# EAGLE board RedBoard_panel_v22 (EAGLE 7.5.0), part 1 of 6
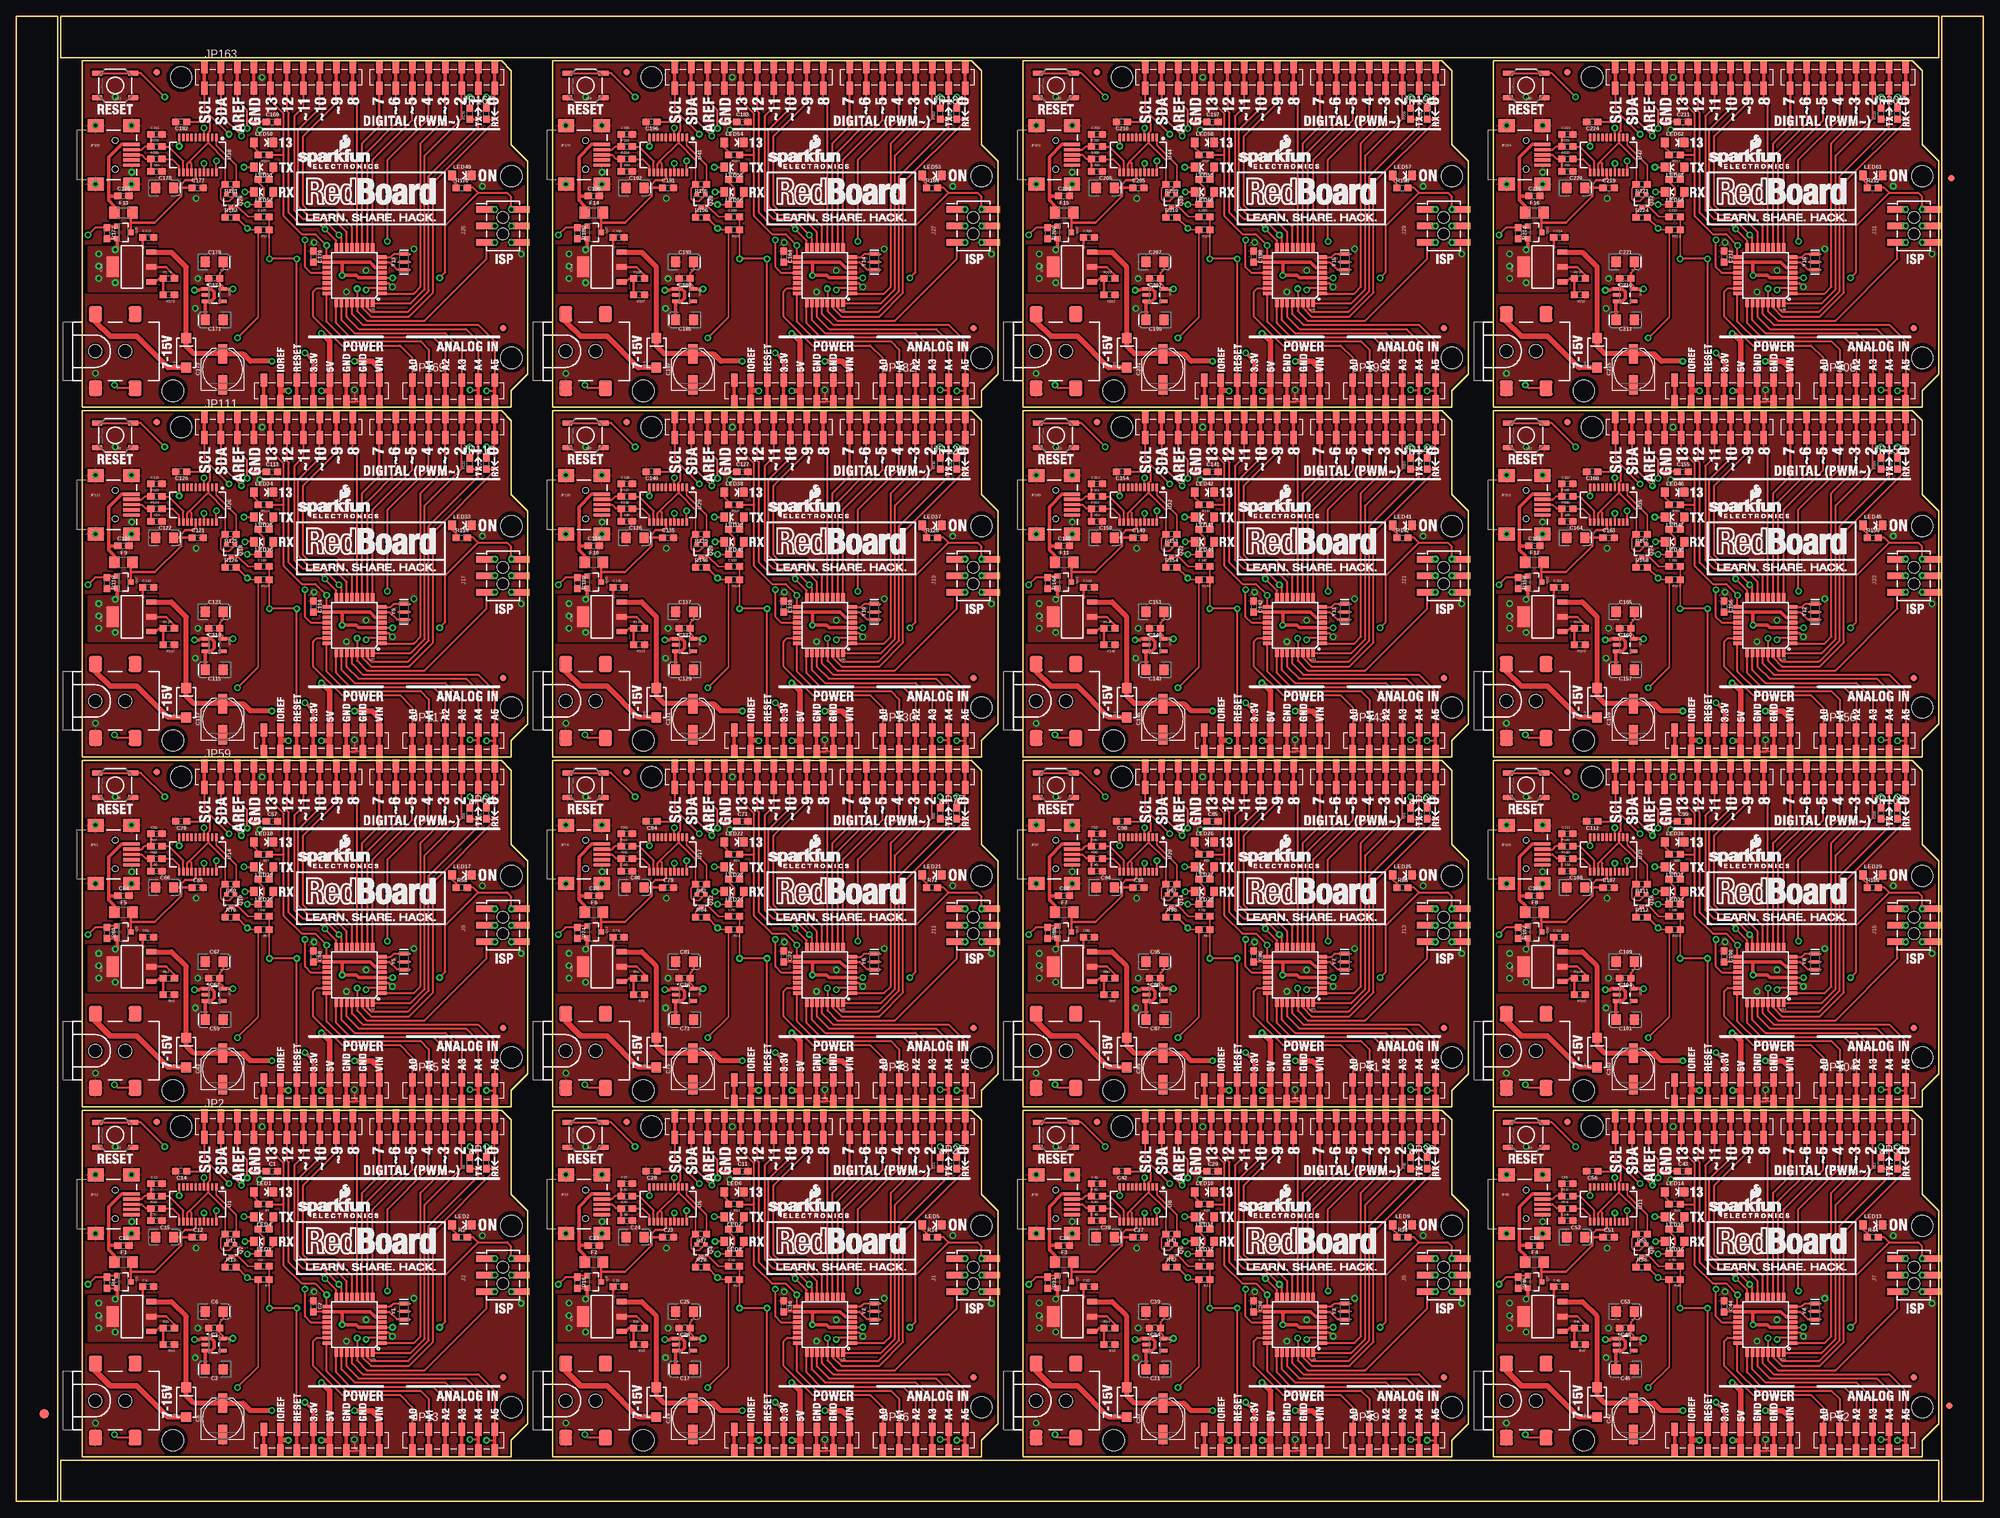
[diagram p0: board, top side]
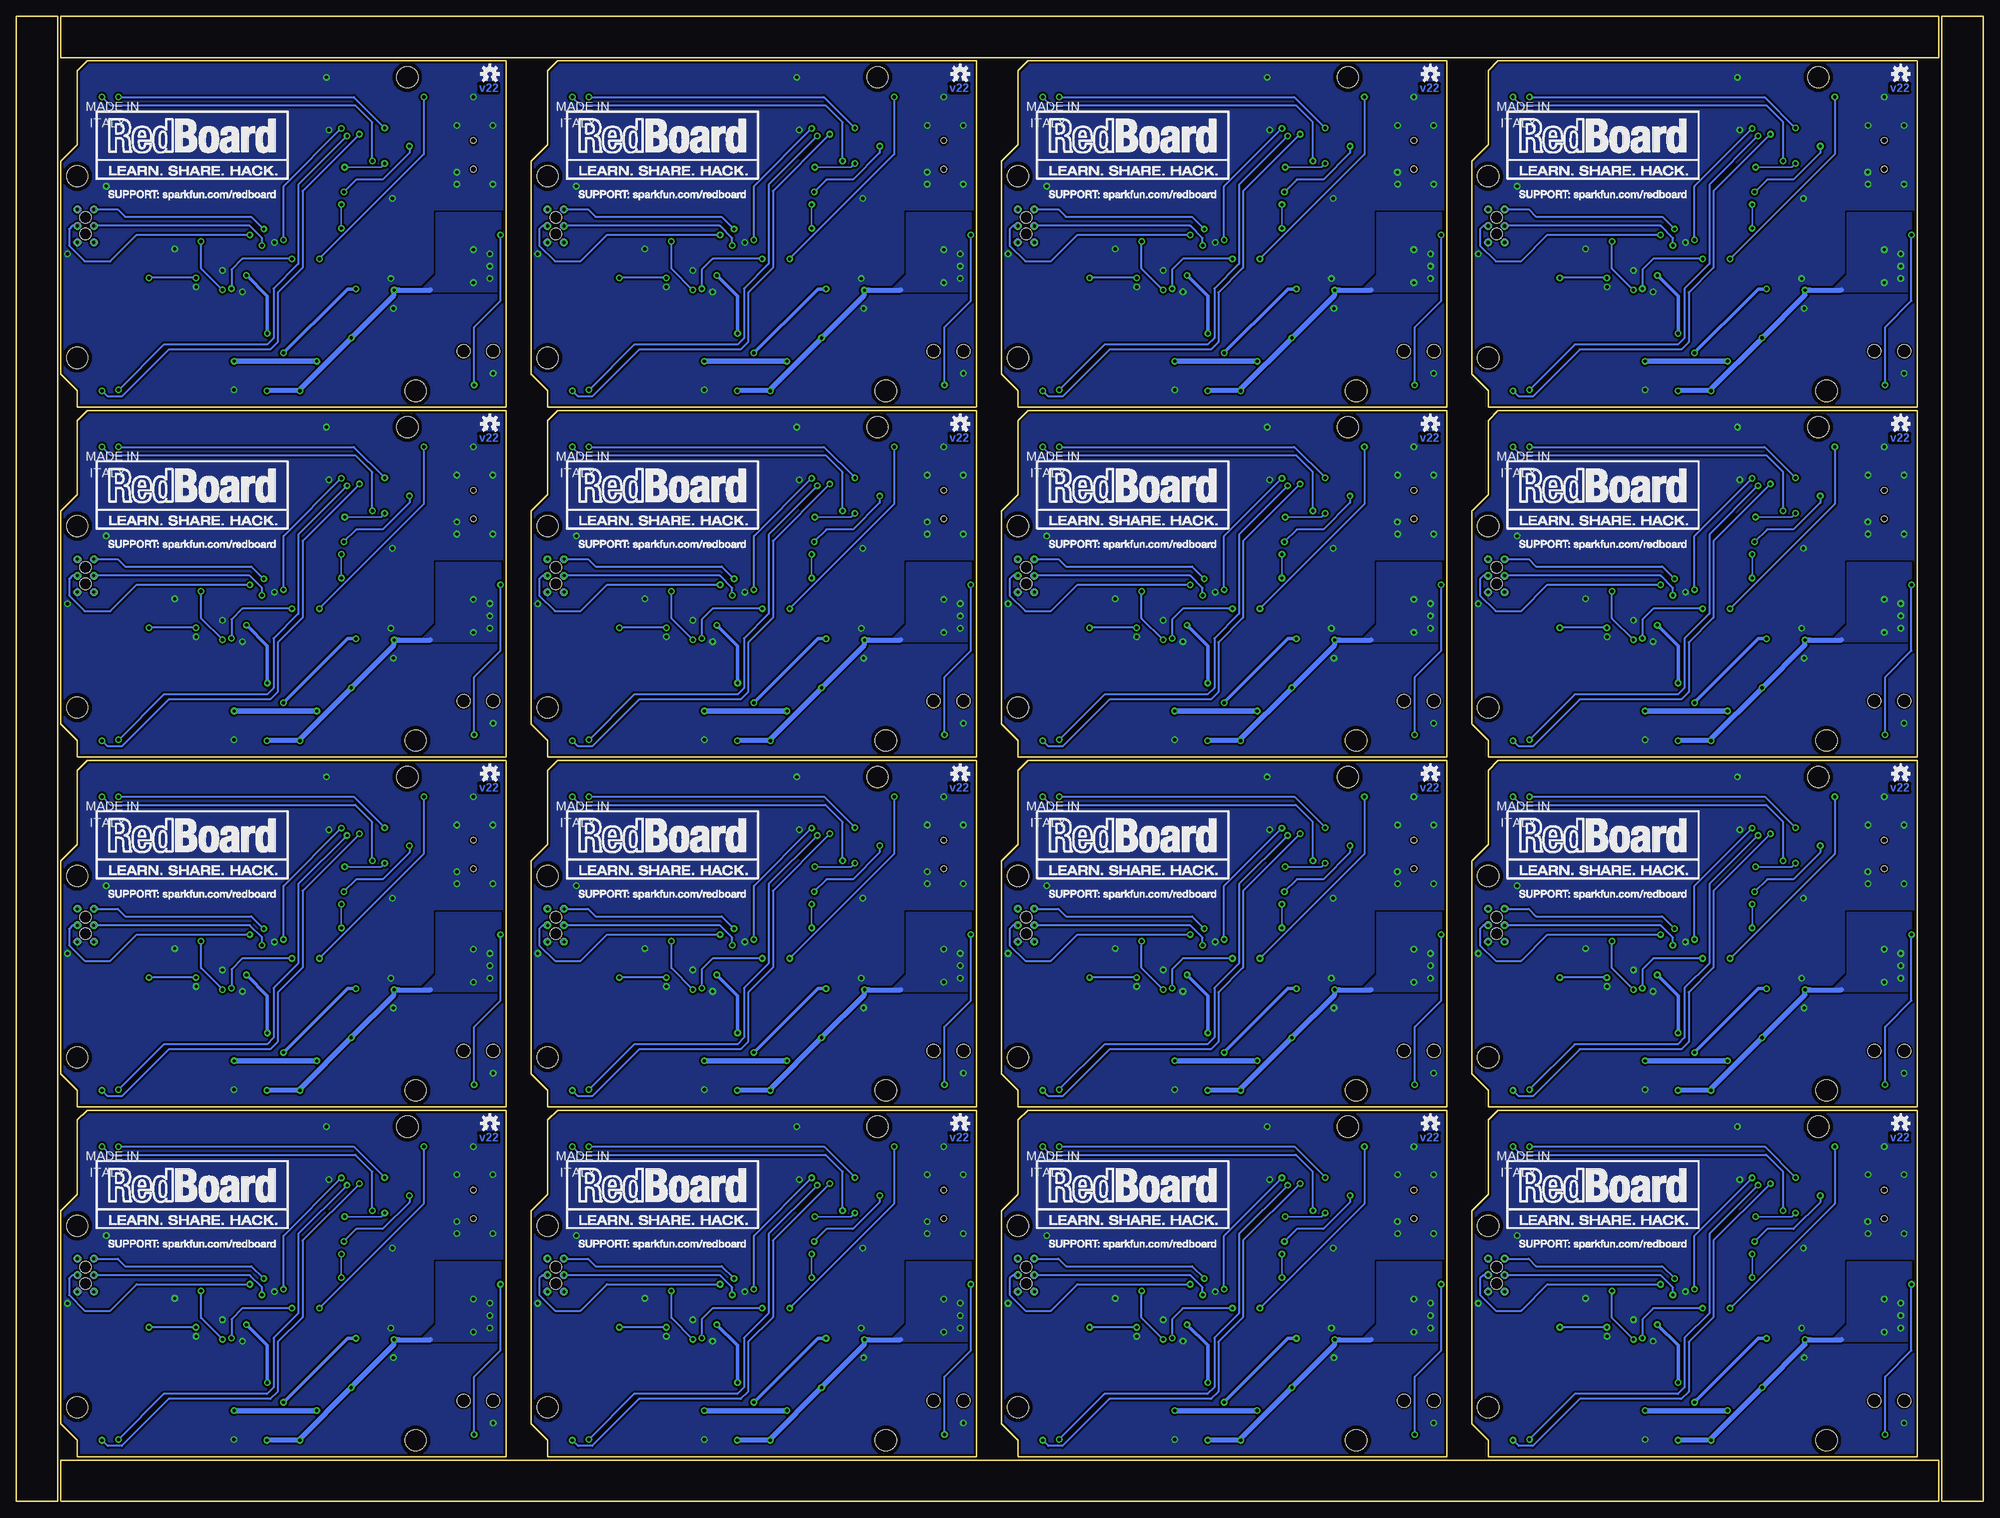
[diagram p1: board, bottom side, seen from below]

Size 302.77 x 228.6 mm. Coordinates in mm from the lower left corner, seen from the top.
Outline: 82.55,0 6.86,0 6.86,6.35 33.02,6.35
Outline: 30.48,6.35 295.91,6.35 295.91,0 80.01,0
Outline: 82.55,222.25 6.86,222.25 6.86,228.6 33.02,228.6
Outline: 30.48,228.6 295.91,228.6 295.91,222.25 80.01,222.25
Outline: 302.77,199.14 302.77,0 296.42,0 296.42,149.61
Outline: 296.42,147.07 296.42,228.6 302.77,228.6 302.77,196.6
Outline: 0,156.21 0,228.6 6.35,228.6 6.35,205.74
Outline: 6.35,208.28 6.35,0 0,0 0,158.75
Outline: 10.16,60.2 74.68,60.2 76.2,58.67 76.2,47.24 78.74,44.7 78.74,11.94 76.2,9.4 76.2,6.86 10.16,6.86 10.16,60.2
Outline: 82.55,60.2 147.07,60.2 148.59,58.67 148.59,47.24 151.13,44.7 151.13,11.94 148.59,9.4 148.59,6.86 82.55,6.86 82.55,60.2
Outline: 154.94,60.2 219.46,60.2 220.98,58.67 220.98,47.24 223.52,44.7 223.52,11.94 220.98,9.4 220.98,6.86 154.94,6.86 154.94,60.2
Outline: 227.33,60.2 291.85,60.2 293.37,58.67 293.37,47.24 295.91,44.7 295.91,11.94 293.37,9.4 293.37,6.86 227.33,6.86 227.33,60.2
Outline: 10.16,114.05 74.68,114.05 76.2,112.52 76.2,101.09 78.74,98.55 78.74,65.79 76.2,63.25 76.2,60.71 10.16,60.71 10.16,114.05
Outline: 82.55,114.05 147.07,114.05 148.59,112.52 148.59,101.09 151.13,98.55 151.13,65.79 148.59,63.25 148.59,60.71 82.55,60.71 82.55,114.05
Outline: 154.94,114.05 219.46,114.05 220.98,112.52 220.98,101.09 223.52,98.55 223.52,65.79 220.98,63.25 220.98,60.71 154.94,60.71 154.94,114.05
Outline: 227.33,114.05 291.85,114.05 293.37,112.52 293.37,101.09 295.91,98.55 295.91,65.79 293.37,63.25 293.37,60.71 227.33,60.71 227.33,114.05
Outline: 10.16,167.89 74.68,167.89 76.2,166.37 76.2,154.94 78.74,152.4 78.74,119.63 76.2,117.09 76.2,114.55 10.16,114.55 10.16,167.89
Outline: 82.55,167.89 147.07,167.89 148.59,166.37 148.59,154.94 151.13,152.4 151.13,119.63 148.59,117.09 148.59,114.55 82.55,114.55 82.55,167.89
Outline: 154.94,167.89 219.46,167.89 220.98,166.37 220.98,154.94 223.52,152.4 223.52,119.63 220.98,117.09 220.98,114.55 154.94,114.55 154.94,167.89
Outline: 227.33,167.89 291.85,167.89 293.37,166.37 293.37,154.94 295.91,152.4 295.91,119.63 293.37,117.09 293.37,114.55 227.33,114.55 227.33,167.89
Outline: 10.16,221.74 74.68,221.74 76.2,220.22 76.2,208.79 78.74,206.25 78.74,173.48 76.2,170.94 76.2,168.4 10.16,168.4 10.16,221.74
Outline: 82.55,221.74 147.07,221.74 148.59,220.22 148.59,208.79 151.13,206.25 151.13,173.48 148.59,170.94 148.59,168.4 82.55,168.4 82.55,221.74
Outline: 154.94,221.74 219.46,221.74 220.98,220.22 220.98,208.79 223.52,206.25 223.52,173.48 220.98,170.94 220.98,168.4 154.94,168.4 154.94,221.74
Outline: 227.33,221.74 291.85,221.74 293.37,220.22 293.37,208.79 295.91,206.25 295.91,173.48 293.37,170.94 293.37,168.4 227.33,168.4 227.33,221.74
Copper layers (1*16): Top 0.035mm / dielectric 1.5mm / Bottom 0.035mm
Design rules "SparkFun-2-layer": minimum track width 7mil, minimum drill 15mil, track to track 8mil, track to pad 8mil, pad to pad 8mil, via to via 8mil, smd to smd 8mil, copper to edge 8mil, drill to drill 8mil, minimum pad ring 12mil, minimum via ring 10mil, stop-mask expansion 4mil, vias tented up to drill 20mil, thermal gap 10mil
Net classes: 0 default: width 0.152 mm, drill 0.305 mm, clearance 0.152 mm
vRestrict: area 10.8,29.2 to 12.2,37.5; area 15.9,30 to 17.5,37.5; area 58,17.7 to 58.7,18.2; area 60.6,17.5 to 61.1,18.4; area 21.5,36.2 to 22.9,38.5; area 10.4,19.8 to 19.6,31.9; area 83.2,29.2 to 84.6,37.5; area 88.3,30 to 89.9,37.5; area 130.4,17.7 to 131.1,18.2; area 133,17.5 to 133.5,18.4; area 93.9,36.2 to 95.2,38.5; area 82.8,19.8 to 91.9,31.9; area 155.6,29.2 to 157,37.5; area 160.7,30 to 162.3,37.5; area 202.8,17.7 to 203.5,18.2; area 205.4,17.5 to 205.9,18.4; area 166.2,36.2 to 167.6,38.5; area 155.2,19.8 to 164.3,31.9; area 228,29.2 to 229.4,37.5; area 233,30 to 234.7,37.5; area 275.2,17.7 to 275.8,18.2; area 277.7,17.5 to 278.3,18.4; area 238.6,36.2 to 240,38.5; area 227.6,19.8 to 236.7,31.9; area 10.8,83.1 to 12.2,91.3; area 15.9,83.8 to 17.5,91.3; area 58,71.5 to 58.7,72; area 60.6,71.4 to 61.1,72.3; area 21.5,90 to 22.9,92.3; area 10.4,73.7 to 19.6,85.7; area 83.2,83.1 to 84.6,91.3; area 88.3,83.8 to 89.9,91.3; area 130.4,71.5 to 131.1,72; area 133,71.4 to 133.5,72.3; area 93.9,90 to 95.2,92.3; area 82.8,73.7 to 91.9,85.7; area 155.6,83.1 to 157,91.3; area 160.7,83.8 to 162.3,91.3; area 202.8,71.5 to 203.5,72; area 205.4,71.4 to 205.9,72.3; area 166.2,90 to 167.6,92.3; area 155.2,73.7 to 164.3,85.7; area 228,83.1 to 229.4,91.3; area 233,83.8 to 234.7,91.3; area 275.2,71.5 to 275.8,72; area 277.7,71.4 to 278.3,72.3; area 238.6,90 to 240,92.3; area 227.6,73.7 to 236.7,85.7; area 10.8,136.9 to 12.2,145.2; area 15.9,137.7 to 17.5,145.2; area 58,125.3 to 58.7,125.9; area 60.6,125.2 to 61.1,126.1; area 21.5,143.9 to 22.9,146.2; area 10.4,127.5 to 19.6,139.6; area 83.2,136.9 to 84.6,145.2; area 88.3,137.7 to 89.9,145.2; area 130.4,125.3 to 131.1,125.9; area 133,125.2 to 133.5,126.1; area 93.9,143.9 to 95.2,146.2; area 82.8,127.5 to 91.9,139.6; area 155.6,136.9 to 157,145.2; area 160.7,137.7 to 162.3,145.2; area 202.8,125.3 to 203.5,125.9; area 205.4,125.2 to 205.9,126.1; area 166.2,143.9 to 167.6,146.2; area 155.2,127.5 to 164.3,139.6; area 228,136.9 to 229.4,145.2; area 233,137.7 to 234.7,145.2; area 275.2,125.3 to 275.8,125.9; area 277.7,125.2 to 278.3,126.1; area 238.6,143.9 to 240,146.2; area 227.6,127.5 to 236.7,139.6; area 10.8,190.8 to 12.2,199; area 15.9,191.5 to 17.5,199; area 58,179.2 to 58.7,179.7; area 60.6,179.1 to 61.1,180; area 21.5,197.7 to 22.9,200; area 10.4,181.4 to 19.6,193.4; area 83.2,190.8 to 84.6,199; area 88.3,191.5 to 89.9,199; area 130.4,179.2 to 131.1,179.7; area 133,179.1 to 133.5,180; area 93.9,197.7 to 95.2,200; area 82.8,181.4 to 91.9,193.4; area 155.6,190.8 to 157,199; area 160.7,191.5 to 162.3,199; area 202.8,179.2 to 203.5,179.7; area 205.4,179.1 to 205.9,180; area 166.2,197.7 to 167.6,200; area 155.2,181.4 to 164.3,193.4; area 228,190.8 to 229.4,199; area 233,191.5 to 234.7,199; area 275.2,179.2 to 275.8,179.7; area 277.7,179.1 to 278.3,180; area 238.6,197.7 to 240,200; area 227.6,181.4 to 236.7,193.4

## Footprints (pad centres in the part's own frame; a part is rotated, then mirrored left to right if it is on the bottom)
0603 = smd 1.1 x 1: 1 -0.85,0; 2 0.85,0
EIA3216 = smd 1.4 x 1.6: + 1.4,0; - -1.4,0
PANASONIC_D = smd 3 x 1.4: + 2.4,0; - -2.4,0
SMA-DIODE = smd 1.524 x 1.47: A -2.277,0; C 2.277,0
FIDUCIAL-1.5X3 = smd 1.5 x 1.5: 1 0,0
FIDUCIAL-1X2 = smd 1 x 1: 1 0,0
1206 = smd 1.6 x 1.8: 1 -1.4,0; 2 1.4,0
SOT223-ALT1 = smd 0.813 x 1.524: 1 -2.271,-3.02; 2 0,-3.02; 3 2.288,-3.02 | smd 3.124 x 1.905: 4 0,2.921
2X3_SMT_POSTS = smd 1 x 3.17: 1 -2.54,-2.54; 2 -2.54,2.54; 3 0,-2.54; 4 0,2.54; 5 2.54,-2.54; 6 2.54,2.54 | hole 1.8: -1.27,0; 1.27,0
POWER_JACK_SMD_OVERPASTE_SUPER_BOMB_DIGITY = smd 2 x 2.4: GND 0,-5.7; P$4 6.1,-5.7; VIN0 0,5.7; VIN1 6.1,5.7 | hole 2.032: 0,0; 4.572,0
1X10_SMD_COMBINED = smd 1 x 2: 1A 0,1.65; 1B 0,-1.65; 2A 2.54,1.65; 2B 2.54,-1.65; 3A 5.08,1.65; 3B 5.08,-1.65; 4A 7.62,1.65; 4B 7.62,-1.65; 5A 10.16,1.65; 5B 10.16,-1.65; 6A 12.7,1.65; 6B 12.7,-1.65; 7A 15.24,1.65; 7B 15.24,-1.65; 8A 17.78,1.65; 8B 17.78,-1.65; 9A 20.32,1.65; 9B 20.32,-1.65; 10A 22.86,1.65; 10B 22.86,-1.65
STAND-OFF = hole 3.302: 0,0
1X08_SMD_COMBINED = smd 1 x 2: 1A 0,1.65; 1B 0,-1.65; 2A 2.54,-1.65; 2B 2.54,1.65; 3A 5.08,1.65; 3B 5.08,-1.65; 4A 7.62,-1.65; 4B 7.62,1.65; 5A 10.16,1.65; 5B 10.16,-1.65; 6A 12.7,-1.65; 6B 12.7,1.65; 7A 15.24,1.65; 7B 15.24,-1.65; 8A 17.78,-1.65; 8B 17.78,1.65
USB-MINIB = smd 2.5 x 0.5: D+ 2.5,0; D- 2.5,0.8; GND 2.5,-1.6; ID 2.5,-0.8; VBUS 2.5,1.6 | smd 2.5 x 2: MTN1 -3,4.5; MTN2 2.5,4.5; MTN3 -3,-4.5; MTN4 2.5,-4.5 | hole 0.9: 0,2.2; 0,-2.2
1X06_SMD_STRAIGHT_COMBO = smd 1 x 2: 1A 0,-1.65; 1B 0,1.65; 2A 2.54,1.65; 2B 2.54,-1.65; 3A 5.08,-1.65; 3B 5.08,1.65; 4A 7.62,1.65; 4B 7.62,-1.65; 5A 10.16,-1.65; 5B 10.16,1.65; 6A 12.7,1.65; 6B 12.7,-1.65
LED-1206 = smd 1.2 x 1.4: A -1.5,0; C 1.5,0
SOT23-3 = smd 0.8 x 0.9: 1 -0.95,-1; 2 0.95,-1; 3 0,1.1
SOT323 = smd 0.7 x 0.7: 1 -0.65,-0.925; 2 0.65,-0.925; 3 0,0.925
TACTILE-SWITCH-SMD = smd 1.524 x 0.762: 1 -2.794,1.905; 2 2.794,1.905; 3 -2.794,-1.905; 4 2.794,-1.905
PAD.03X.05 = smd 1.27 x 1.27: P$1 0,0
SSOP20_L = smd 0.381 x 1.143: 1 -2.857,-2.68; 2 -2.223,-2.68; 3 -1.587,-2.68; 4 -0.953,-2.68; 5 -0.318,-2.68; 6 0.318,-2.68; 7 0.953,-2.68; 8 1.587,-2.68; 9 2.223,-2.68; 10 2.857,-2.68; 11 2.857,2.68; 12 2.223,2.68; 13 1.587,2.68; 14 0.953,2.68; 15 0.318,2.68; 16 -0.318,2.68; 17 -0.953,2.68; 18 -1.587,2.68; 19 -2.223,2.68; 20 -2.857,2.68
SOT23-5 = smd 0.55 x 1.2: 1 -0.95,-1.3; 2 0,-1.3; 3 0.95,-1.3; 4 0.95,1.3; 5 -0.95,1.3
TQFP32-08 = smd 1.27 x 0.559: 1 -4.293,2.8; 2 -4.293,2; 3 -4.293,1.2; 4 -4.293,0.4; 5 -4.293,-0.4; 6 -4.293,-1.2; 7 -4.293,-2; 8 -4.293,-2.8; 17 4.293,-2.8; 18 4.293,-2; 19 4.293,-1.2; 20 4.293,-0.4; 21 4.293,0.4; 22 4.293,1.2; 23 4.293,2; 24 4.293,2.8 | smd 0.559 x 1.27: 9 -2.8,-4.293; 10 -2,-4.293; 11 -1.2,-4.293; 12 -0.4,-4.293; 13 0.4,-4.293; 14 1.2,-4.293; 15 2,-4.293; 16 2.8,-4.293; 25 2.8,4.293; 26 2,4.293; 27 1.2,4.293; 28 0.4,4.293; 29 -0.4,4.293; 30 -1.2,4.293; 31 -2,4.293; 32 -2.8,4.293
RESONATOR-SMD-3.2X1.3 = smd 0.45 x 1.905: 1 -1.2,0; 2 0,0; 3 1.2,0